# Altium PCB ProbeHead.PcbDoc (part 1 of 2)
Units mm, origin at the board's own origin, x right, y up, seen from the top; angles counter-clockwise.
Board outline 70 x 35 mm, 4 copper layers (L1, L2, L3, L4), stack 1.883 mm thick; 107 components, 62 nets, 327 pads, 211 vias.
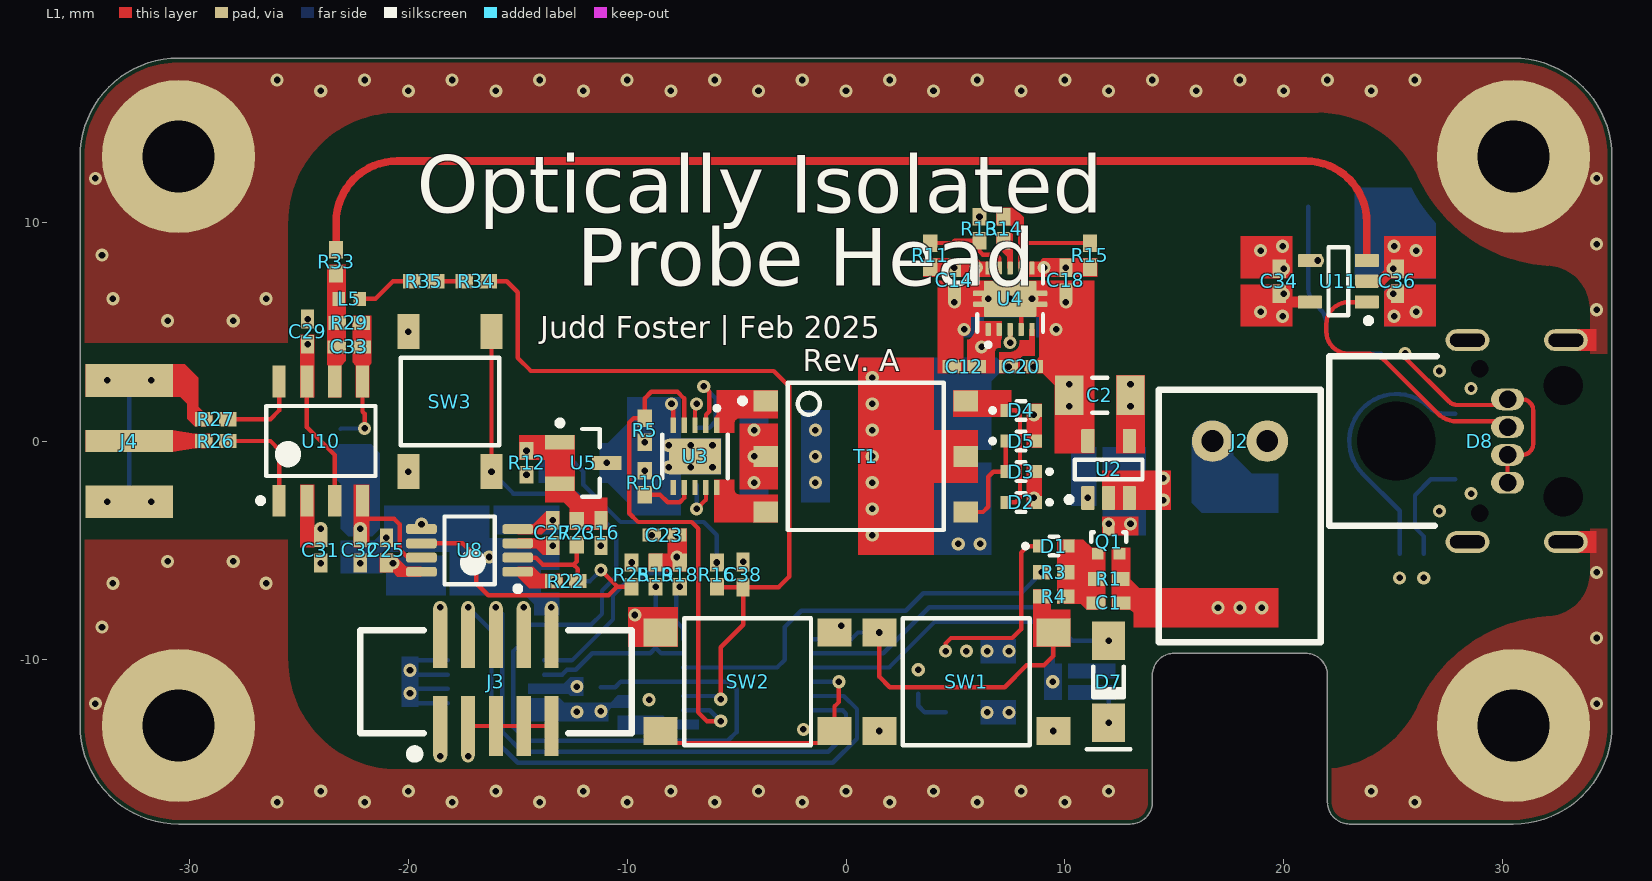
[diagram p0: L1 view]
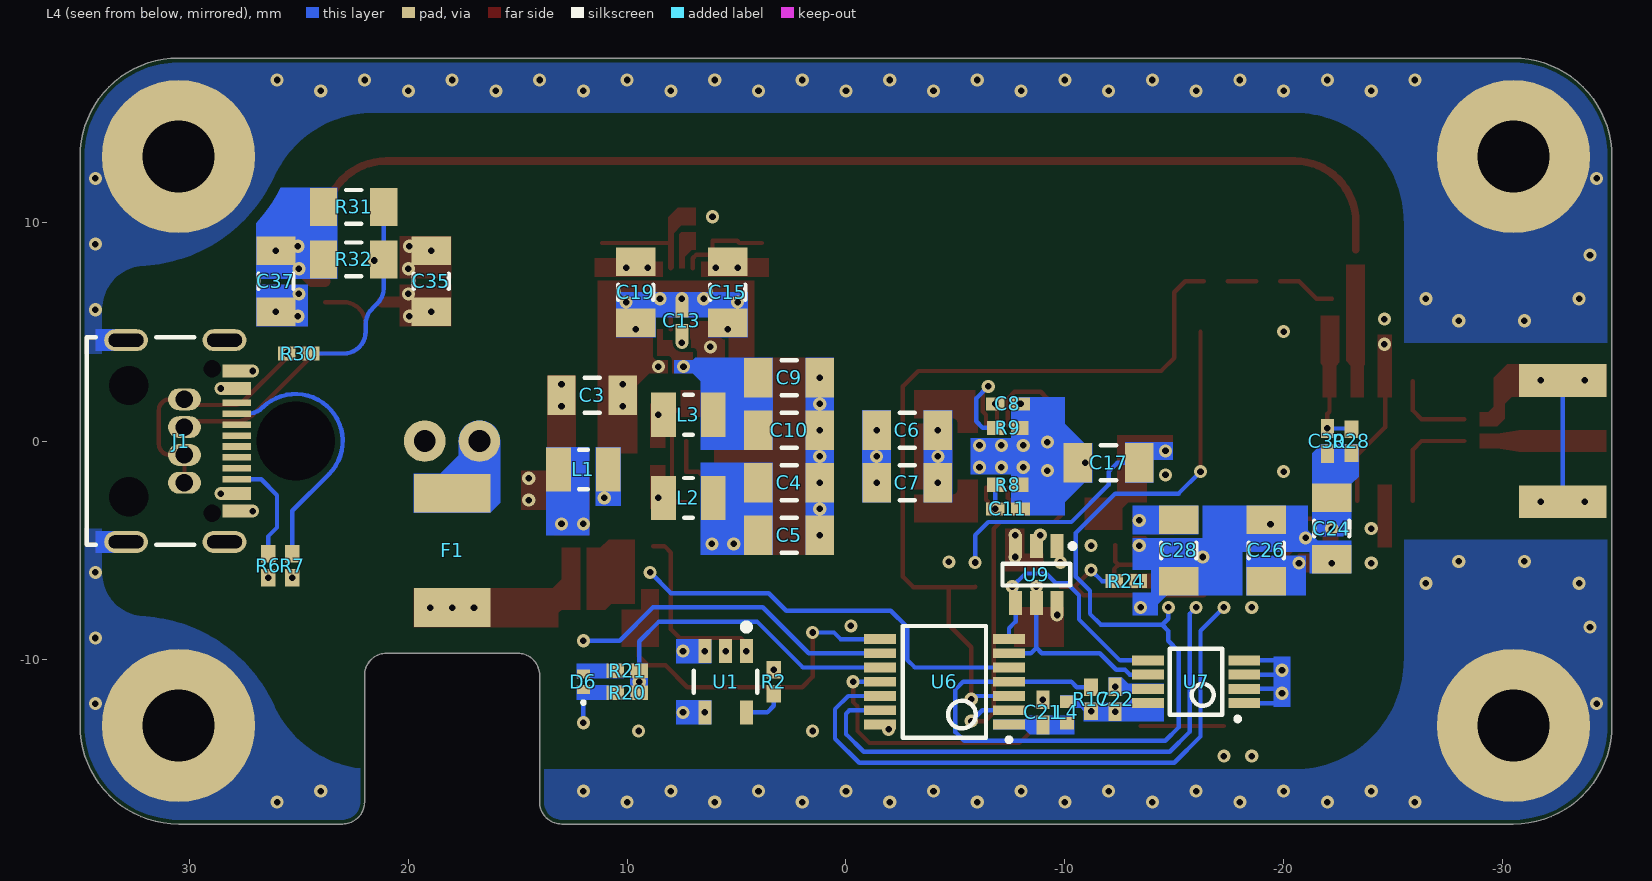
[diagram p1: L4 view, seen from below]
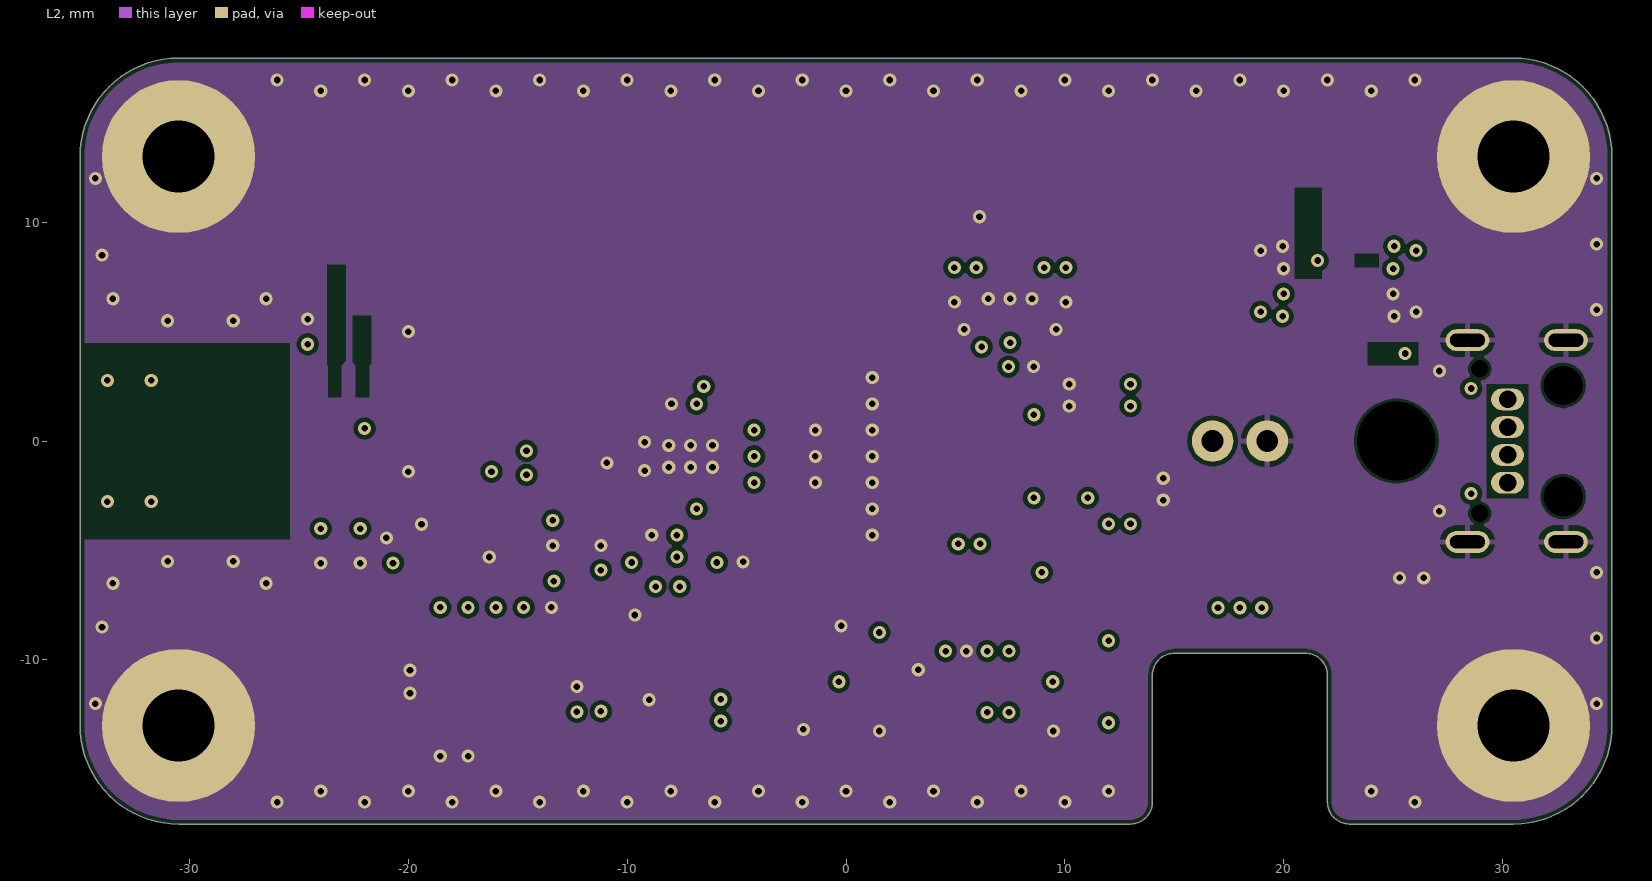
[diagram p2: L2]
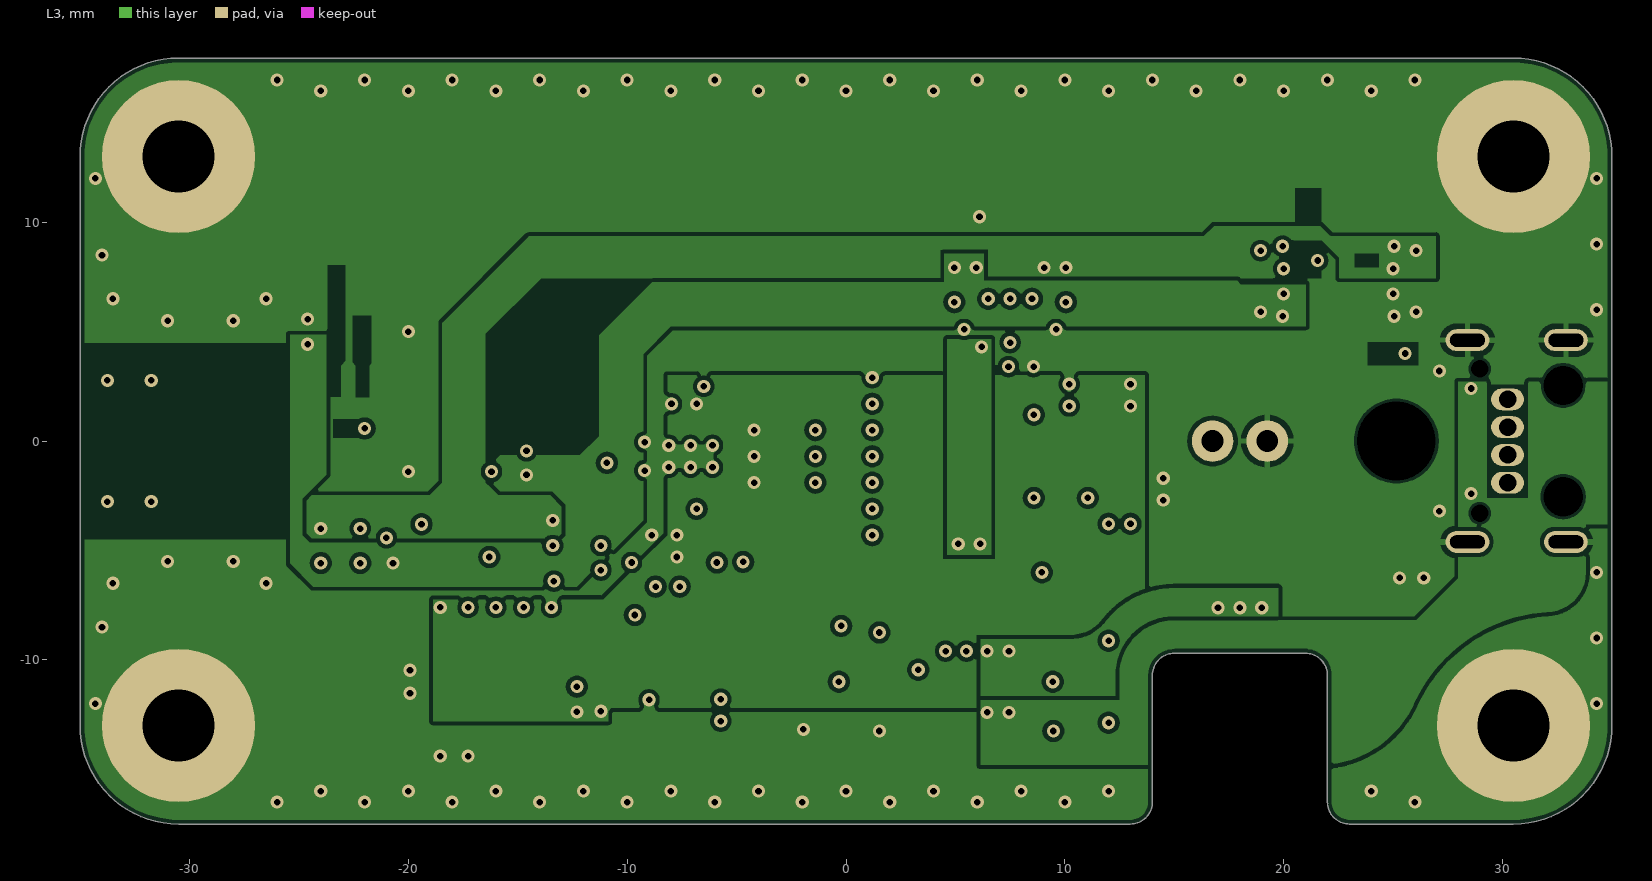
[diagram p3: L3]

## Layer stack, top to bottom
Top Solder: solder mask 0.0102, Solder Resist, Dk 3.5
L1: signal copper 0.0356
Dielectric 2: prepreg 0.0711, PP-006, Dk 4.1
L2: signal copper 0.035
Dielectric 1: dielectric 1.6, FR-4, Dk 4.8
L3: signal copper 0.035
Dielectric 3: prepreg 0.0711, PP-006, Dk 4.1
L4: signal copper 0.0356
Bottom Solder: solder mask 0.0102, Solder Resist, Dk 3.5

## Board outline
-30.5,-17.5 13,-17.5 ccw(c13,-16.5) 14,-16.5 14,-10.7 cw(c15,-10.7) 15,-9.7 21,-9.7 cw(c21,-10.7) 22,-10.7 22,-16.5 ccw(c23,-16.5) 23,-17.5 30.5,-17.5 ccw(c30.5,-13) 35,-13 35,13 ccw(c30.5,13) 30.5,17.5 -30.5,17.5 ccw(c-30.5,13) -35,13 -35,-13 ccw(c-30.5,-13)

## Design rules (kind name [scope] priority, off if disabled: settings)
BoardOutlineClearance BoardOutlineClearance_Exceptions [HasFootprint('GCT_USB4110-GF-A') Or HasFootprint('INDUSTRIALFIBEROPTICS_IF-E99B')] p1: gap=0 ignorepadtopadclearanceinfootprint=FALSE
BoardOutlineClearance [All] p2: gap=0.2 ignorepadtopadclearanceinfootprint=FALSE
Clearance Clearance_MOLEX_2171800001 [HasFootprint('MOLEX_2171800001') vs HasFootprint('MOLEX_2171800001')] p1: gap=0.13 ignorepadtopadclearanceinfootprint=FALSE except(0.07: Arc-Hole Track-Hole SMDPad-Hole THPad-Hole Via-Hole Fill-Hole Poly-Hole Region-Hole Text-Hole; 0.2: Arc-Fill Arc-Poly Track-Fill Track-Poly SMDPad-Fill SMDPad-Poly THPad-Fill THPad-Poly Via-Fill Via-Poly Fill-Fill Fill-Poly Poly-Poly)
Clearance [All] p2: gap=0.13 ignorepadtopadclearanceinfootprint=FALSE except(0.2: Arc-Fill Arc-Poly Track-Fill Track-Poly SMDPad-Fill SMDPad-Poly THPad-Fill THPad-Poly Via-Fill Via-Poly Fill-Fill Fill-Poly Poly-Poly)
HoleSize [All] p1: absolutevalues=TRUE maxlimit=6 minlimit=0.3 maxpercent=80.000 minpercent=20.000
MinimumSolderMaskSliver [All] p1: minsoldermaskwidth=0.1
PolygonConnect [All] p1: thpad.connectstyle=Relief thpad.reliefconductorwidth=0.254 thpad.reliefentries=4 thpad.polygonreliefangle="90 Angle" thpad.airgapwidth=0.254 smdpad.connectstyle=Relief smdpad.reliefconductorwidth=0.254 smdpad.reliefentries=4 smdpad.polygonreliefangle="90 Angle" smdpad.airgapwidth=0.254 via.connectstyle=Direct via.reliefconductorwidth=0.254 via.reliefentries=4 via.polygonreliefangle="90 Angle" via.airgapwidth=0.254
RoutingVias [All] p1: holewidth=0.3 width=0.6 viastyle="Through Hole" minholewidth=0.3 minwidth=0.6 maxholewidth=0.5 maxwidth=1
SilkToSolderMaskClearance [IsPad] p1: minsilkscreentomaskgap=0.15 clearancetoexposedcopper=TRUE
SolderMaskExpansion SolderMaskExpansion_Via [IsVia] p1: expansion=0.102 istentingtop=TRUE
SolderMaskExpansion [All] p2: expansion=0.05 istentingtop=FALSE
Width [All] p1: maxlimit=2 minlimit=0.2 preferedwidth=0.4
27 further rules are at their usual default settings.

## Classes and differential pairs
net class S50: AMP.OUT
component class PWR: C1 C2 C3 C4 C5 C6 C7 C8 C9 C10 C11 C12 C13 C14 C15 C16 C17 C18 C19 C20 D1 D2 D3 D4 D5 F1 J1 J2 L1 L2 L3 Q1 R1 R2 R3 R4 R5 R6 R7 R8 R9 R10 R11 R12 R13 R14 R15 SW1 T1 U1 U2 U3 U4 U5
component class FE: C29 C30 C31 C32 C33 C38 J4 L5 R16 R26 R27 R28 R29 R33 R34 R35 U10
component class EO: C34 C35 C36 C37 D8 R30 R31 R32 U11
component class CTRL: C21 C22 D6 D7 J3 L4 R17 R18 R19 R20 R21 SW2 SW3 U6 U7
component class BIAS: C23 C24 C25 C26 C27 C28 R22 R23 R24 R25 U8 U9

## Components (designator, comment, footprint, x,y, rotation, side; value= is the part's Value field where it differs from the comment)
C1 "100n,10%,25V,X7R,0402" CAPC1005X06N 12,-7.4 r0 top value=100nF
C2 "10u,20%,50V,X5R,1206" CAPC3216X16N 11.6,2.1 r0 top value=10u
C3 "10u,20%,50V,X5R,1206" CAPC3216X16N 11.6,2.1 r0 bottom value=10u
C4 "10u,20%,50V,X5R,1206" CAPC3216X16N 2.6,-1.9 r0 bottom value=10u
C5 "10u,20%,50V,X5R,1206" CAPC3216X16N 2.6,-4.3 r0 bottom value=10u
C6 "10u,20%,50V,X5R,1206" CAPC3216X16N -2.8,0.5 r180 bottom value=10u
C7 "10u,20%,50V,X5R,1206" CAPC3216X16N -2.8,-1.9 r180 bottom value=10u
C8 "100n,10%,25V,X7R,0402" CAPC1005X06N -7.4,1.7 r0 bottom value=100nF
C9 "10u,20%,50V,X5R,1206" CAPC3216X16N 2.6,2.9 r180 bottom value=10u
C10 "10u,20%,50V,X5R,1206" CAPC3216X16N 2.6,0.5 r180 bottom value=10u
C11 "100n,10%,25V,X7R,0402" CAPC1005X06N -7.4,-3.1 r0 bottom value=100nF
C12 "100n,10%,25V,X7R,0402" CAPC1005X06N 5.4,3.4 r0 top value=100nF
C13 "10n,10%,25VDC,X7R,0402" CAPC1005X06N 7.5,5.5 r90 bottom
C14 "100n,10%,25V,X7R,0402" CAPC1005X06N 4.95,7.35 r90 top value=100nF
C15 "10u,20%,50V,X5R,1206" CAPC3216X16N 5.4,6.8 r90 bottom value=10u
C16 "100n,10%,25V,X7R,0402" CAPC1005X06N -11.2,-4.2 r90 top value=100nF
C17 "10u,20%,50V,X5R,1206" CAPC3216X16N -12,-1 r180 bottom value=10u
C18 "100n,10%,25V,X7R,0402" CAPC1005X06N 10.05,7.35 r270 top value=100nF
C19 "10u,20%,50V,X5R,1206" CAPC3216X16N 9.6,6.8 r270 bottom value=10u
C20 "100n,10%,25V,X7R,0402" CAPC1005X06N 8,3.4 r0 top value=100nF
C21 "100n,10%,25V,X7R,0402" CAPC1005X06N -9,-12.4 r270 bottom value=100nF
C22 "100n,10%,25V,X7R,0402" CAPC1005X06N -12.3,-11.8 r270 bottom value=100nF
C23 "100n,10%,25V,X7R,0402" CAPC1005X06N -8.3,-4.3 r0 top value=100nF
C24 "10u,20%,50V,X5R,1206" CAPC3216X16N -22.2,-4 r90 bottom value=10u
C25 "100n,10%,25V,X7R,0402" CAPC1005X06N -21,-5 r270 top value=100nF
C26 "10u,20%,50V,X5R,1206" CAPC3216X16N -19.2,-5 r270 bottom value=10u
C27 "100n,10%,25V,X7R,0402" CAPC1005X06N -13.4,-4.2 r270 top value=100nF
C28 "10u,20%,50V,X5R,1206" CAPC3216X16N -15.2,-5 r270 bottom value=10u
C29 "100n,10%,25V,X7R,0402" CAPC1005X06N -24.6,5 r270 top value=100nF
C30 "Omit,0402" CAPC1005X06N -22,0 r90 bottom value=Omit
C31 "100n,10%,25V,X7R,0402" CAPC1005X06N -24,-5 r270 top value=100nF
C32 "100n,10%,25V,X7R,0402" CAPC1005X06N -22.2,-5 r90 top value=100nF
C33 "Omit,0402" CAPC1005X06N -22.7,4.3 r180 top value=Omit
C34 "100n,10%,25V,X7R,0402" CAPC1005X06N 19.8,7.3 r270 top value=100nF
C35 "10u,20%,50V,X5R,1206" CAPC3216X16N 18.95,7.3 r270 bottom value=10u
C36 "100n,10%,25V,X7R,0402" CAPC1005X06N 25.2,7.3 r270 top value=100nF
C37 "10u,20%,50V,X5R,1206" CAPC3216X16N 26.05,7.3 r270 bottom value=10u
C38 "100n,10%,25V,X7R,0402" CAPC1005X06N -4.7,-6.1 r270 top value=100nF
D1 "PMEG2010AEBF" NEXPERIA_PKG_SOD523 9.5,-4.8 r0 top
D2 "PMEG2010AEBF" NEXPERIA_PKG_SOD523 8,-2.8 r180 top
D3 "PMEG2010AEBF" NEXPERIA_PKG_SOD523 8,-1.4 r180 top
D4 "PMEG2010AEBF" NEXPERIA_PKG_SOD523 8,1.4 r0 top
D5 "PMEG2010AEBF" NEXPERIA_PKG_SOD523 8,0 r0 top
D6 "CDBQR0130R" DFN65P100X50-2N 12,-11 r90 bottom
D7 "Red/Green" LED_XZMDKVG55W-4 12,-11 r90 top
D8 "IF-E99B" INDUSTRIALFIBEROPTICS_IF-E99B 30.23,0 r270 top
F1 "500mA" BELFUSE_CHIP1812 18,-5 r270 bottom
J1 "USB-C" MOLEX_2171800001 32.9,0 r270 bottom
J2 "S2B-XH-A" JST_S2B-XH-A 18,0 r0 top
J3 "3221-10-0300-00" "CNC Tech_3221-10-0300-00" -16,-11 r90 top
J4 "CON-SMA-EDGE-S" RFSOLUTIONS_CON-SMA-EDGE-S -33.25,0 r90 top
L1 "10uH,20%,680mA,1007" TAIYO-YUDEN_LSQPA251818T100M 12,-1.3 r180 bottom value=10uH
L2 "10uH,20%,680mA,1007" TAIYO-YUDEN_LSQPA251818T100M 7.2,-2.6 r180 bottom value=10uH
L3 "10uH,20%,680mA,1007" TAIYO-YUDEN_LSQPA251818T100M 7.2,1.2 r180 bottom value=10uH
L4 "470R" INDC1005X05N -10.1,-12.4 r270 bottom
L5 "470R" INDC1005X05N -22.7,6.5 r180 top
Q1 "FDY102PZ" ONSEMI_SC-89 12,-4.6 r90 top
R1 "5k11,1%,0.063W,0402" RESC1005X04N 12,-6.3 r0 top value=5k11
R2 "5k11,1%,0.063W,0402" RESC1005X04N 3.3,-11 r270 bottom value=5k11
R3 "1k,0.1%,0.063W,0402" RESC1005X04N 9.5,-6 r0 top value=1k
R4 "10R,1%,0.063W,0402" RESC1005X04N 9.5,-7.1 r180 top value=10R
R5 "10k,0.1%,0.063W,0402" RESC1005X04N -9.2,0.5 r90 top value=10k
R6 "5k11,1%,0.063W,0402" RESC1005X04N 26.4,-5.7 r90 bottom value=5k11
R7 "5k11,1%,0.063W,0402" RESC1005X04N 25.3,-5.7 r90 bottom value=5k11
R8 "Omit" RESC1005X04N -7.4,-2 r0 bottom
R9 "Omit" RESC1005X04N -7.4,0.6 r0 bottom
R10 "Omit" RESC1005X04N -9.2,-1.9 r270 top
R11 "10k,0.1%,0.063W,0402" RESC1005X04N 3.85,8.5 r270 top value=10k
R12 "1k,0.1%,0.063W,0402" RESC1005X04N -14.6,-1 r270 top value=1k
R13 "10k,0.1%,0.063W,0402" RESC1005X04N 6.1,9.7 r270 top value=10k
R14 "10k,0.1%,0.063W,0402" RESC1005X04N 7.2,9.7 r270 top value=10k
R15 "10k,0.1%,0.063W,0402" RESC1005X04N 11.15,8.5 r90 top value=10k
R16 "1k,0.1%,0.063W,0402" RESC1005X04N -5.9,-6.1 r90 top value=1k
R17 "10k,0.1%,0.063W,0402" RESC1005X04N -11.2,-11.8 r270 bottom value=10k
R18 "5k11,1%,0.063W,0402" RESC1005X04N -7.6,-6.1 r90 top value=5k11
R19 "5k11,1%,0.063W,0402" RESC1005X04N -8.7,-6.1 r90 top value=5k11
R20 "330R,1%,0.063W,0402" RESC1005X04N 10,-11.5 r180 bottom value=330R
R21 "1k,0.1%,0.063W,0402" RESC1005X04N 10,-10.5 r180 bottom value=1k
R22 "1k,0.1%,0.063W,0402" RESC1005X04N -12.8,-6.4 r180 top value=1k
R23 "1k,0.1%,0.063W,0402" RESC1005X04N -12.3,-4.2 r270 top value=1k
R24 "1k,0.1%,0.063W,0402" RESC1005X04N -12.8,-6.4 r0 bottom value=1k
R25 "1k,0.1%,0.063W,0402" RESC1005X04N -9.8,-6.1 r270 top value=1k
R26 "10R,1%,0.063W,0402" RESC1005X04N -28.8,0 r0 top value=10R
R27 "10R,1%,0.063W,0402" RESC1005X04N -28.8,1 r0 top value=10R
R28 "Omit" RESC1005X04N -23.1,0 r90 bottom
R29 "0R0,0.1W,0402" RESC1005X04N -22.7,5.4 r180 top value=0R
R30 "0R0,0.1W,0402" RESC1005X04N 25,4 r0 bottom value=0R
R31 "499R,0.1%,0.52W,1206" VISHAY_PKG_TNPW1206 22.5,10.7 r180 bottom value=499R
R32 "499R,0.1%,0.52W,1206" VISHAY_PKG_TNPW1206 22.5,8.3 r180 bottom value=499R
R33 "49R9,1%,0.063W,0402" RESC1005X04N -23.3,8.2 r90 top value=49R9
R34 "1k,0.1%,0.063W,0402" RESC1005X04N -16.9,7.3 r180 top value=1k
R35 "1k,0.1%,0.063W,0402" RESC1005X04N -19.3,7.3 r180 top value=1k
SW1 "PTS645SK43SMTR92 LFS" "C&K_PTS645SK43SMTR92 LFS" 5.5,-11 r0 top
SW2 "PTS645SK43SMTR92 LFS" "C&K_PTS645SK43SMTR92 LFS" -4.5,-11 r0 top
SW3 "PTS525SM15SMTR2 LFS" "C&K_PTS525SM15SMTR2 LFS" -18.1,1.8 r90 top
T1 "760390013" WURTH_760390013 0.9,-0.7 r0 top
U1 "MCP73831T-2ACI/OT" MICROCHIP_PKG_SOT23(C04-2091-OT) 5.5,-11 r0 bottom
U2 "TPS613222ADBVR" TEXASINSTRUMENTS_PKG_DBV0005A 12,-1.3 r90 top
U3 "LT3999EDD#PBF" ANALOGDEVICES_PKG_DD -6.9,-0.7 r270 top
U4 "TPS7A3901DSCR" TEXASINSTRUMENTS_PKG_DSC0010J 7.5,6.5 r90 top
U5 "TL431BIDBZR" SOT95P240X120-3N -12,-1 r0 top
U6 "PIC16F15323T-I/ST" MICROCHIP_PKG_TSSOP-14(C04-2087A) -4.5,-11 r0 bottom
U7 "24LC256T-I/MS" MICROCHIP_PKG_MSOP8(C04-111-MS) -16,-11 r0 bottom
U8 "LM7332MMX/NOPB" TEXASINSTRUMENTS_PKG_DGK0008A -17.2,-5 r180 top
U9 "MCP4725A0T-E/CH" SOTFL95P260X145-6 -8.7,-6.1 r270 bottom
U10 "AD8130ARZ" ANALOGDEVICES_PKG_R-8 -24,0 r90 top
U11 "LMH6609MF/NOPB" TEXASINSTRUMENTS_PKG_DBV0005A 22.5,7.3 r180 top

## Footprints (in the part's own frame and the unit in brackets; to place one, negate y for a bottom-side part, rotate by r counter-clockwise, add the part's x,y. Pads: shape width x height; smd on the part's side, far side on the other; paste and mask are expansions set on the pad)
ANALOGDEVICES_PKG_DD [mm]
  rect 0.7x0.25 smd: 1(-1.425,1) 2(-1.425,0.5) 3(-1.425,0) 4(-1.425,-0.5) 5(-1.425,-1) 6(1.425,-1) 7(1.425,-0.5) 8(1.425,0) 9(1.425,0.5) 10(1.425,1)
  rect 1.65x2.38 smd: 11(0,0)
  silkscreen extent -2.3,-1.5 1,1.5, body extent -1.5,-1.5 1.5,1.5, height 0.8
ANALOGDEVICES_PKG_R-8 [mm]
  rect 1.45x0.6 smd: 1(-2.725,1.905) 2(-2.725,0.635) 3(-2.725,-0.635) 4(-2.725,-1.905) 5(2.725,-1.905) 6(2.725,-0.635) 7(2.725,0.635) 8(2.725,1.905)
  silkscreen extent -2.85,-2.5 1.6,2.88, body extent -2,-2.5 2,2.5, height 1.75
BELFUSE_CHIP1812 [mm] "BELFUSE_CHIP1812"
  rect 1.78x3.5 smd: 1(-2.615,0) 2(2.615,0)
  body extent -2.27,-1.62 2.27,1.62, height 0.7
"C&K_PTS525SM15SMTR2 LFS" [mm] "C&K_PTS525SM15SMTR2 LFS"
  rect 1.6x1 smd mask+0.05: 1(-3.2,1.9) 2(3.2,1.9) 3(-3.2,-1.9) 4(3.2,-1.9)
  silkscreen extent -2,-2.25 2,2.25, body extent -3.2,-2.55 3.2,2.55, height 1.6
"C&K_PTS645SK43SMTR92 LFS" [mm] "C&K_PTS645SK43SMTR92 LFS"
  rect 1.55x1.3 smd mask+0.05: 1(-3.975,2.25) 2(3.975,2.25) 3(-3.975,-2.25) 4(3.975,-2.25)
  silkscreen extent -2.9,-2.9 2.9,2.9, body extent -3,-3 3,3, height 4.3
CAPC1005X06N [mm]
  rect 0.85x0.6 smd: 1(-0.575,0) 2(0.575,0)
  body extent -0.53,-0.28 0.53,0.27, height 0.55
CAPC3216X16N [mm] "Chip Capacitor, 2-Leads, Body 3.20x1.60mm, IPC Medium Density"
  rect 1.3x1.8 smd: 1(-1.4,0) 2(1.4,0)
  silkscreen extent -0.35,-0.8 0.35,0.8, body extent -1.75,-0.95 1.75,0.95, height 1.6
"CNC Tech_3221-10-0300-00" [mm] "CNC Tech_3221-10-0300-00"
  rect 2.76x0.65 smd mask+0.05: 1(-2.02,2.54) 2(2.02,2.54) 3(-2.02,1.27) 4(2.02,1.27) 5(-2.02,0) 6(2.02,0) 7(-2.02,-1.27) 8(2.02,-1.27) 9(-2.02,-2.54) 10(2.02,-2.54)
  silkscreen extent -3.5,-6.2 2.35,6.2, body extent -2.5,-6.35 2.5,6.35, height 5.55
DFN65P100X50-2N [mm] "DFN, 2-Leads, Body 0.60x1.00mm, Pitch 0.65mm, IPC Medium Density"
  rect 0.4x0.6 smd: 1(-0.35,0) 2(0.35,0)
  silkscreen extent -1,-0.05 -0.9,0.05, body extent -0.5,-0.3 0.5,0.3, height 0.5
INDC1005X05N [mm] "Chip Inductor, 2-Leads, Body 1.00x0.50mm, IPC Medium Density"
  rect 0.57x0.64 smd: 1(-0.49,0) 2(0.49,0)
  body extent -0.5,-0.25 0.5,0.25, height 0.5
INDUSTRIALFIBEROPTICS_IF-E99B [mm]
  oval 1x1.5 hole 0.8 mask+0: 1(1.905,0) 2(0.635,0) 3(-0.635,0) 4(-1.905,0)
  round 0 hole 1.8 unplated mask+0: ""(-2.54,2.54) ""(2.54,2.54)
  round 0 hole 3.6 unplated mask+0: ""(0,-5.08)
  silkscreen extent -3.87,-8.14 3.87,-3.23, body extent -4.32,-8.31 4.32,19.44, height 11.3
JST_S2B-XH-A [mm]
  round 1.9 hole 1 mask+0.05: 1(-1.25,0) 2(1.25,0)
  silkscreen extent -3.7,-9.2 3.7,2.35, body extent -3.7,-9.2 3.7,2.3, height 6.1
LED_XZMDKVG55W-4 [mm] "SunLED XZMDKVG55W-4"
  rect 1.75x1.5 smd: 1(-1.875,0) 2(1.875,0)
  silkscreen extent -3.09,-1 0.7,1, body extent -1.6,-0.8 1.6,0.8, height 1.1
MICROCHIP_PKG_MSOP8(C04-111-MS) [mm]
  rect 1.45x0.45 smd: 1(-2.2,0.975) 2(-2.2,0.325) 3(-2.2,-0.325) 4(-2.2,-0.975) 5(2.2,-0.975) 6(2.2,-0.325) 7(2.2,0.325) 8(2.2,0.975)
  silkscreen extent -2,-1.5 1.2,1.8, body extent -1.5,-1.5 1.5,1.5, height 1.1
MICROCHIP_PKG_SOT23(C04-2091-OT) [mm]
  rect 0.6x1.1 smd: 1(-0.95,-1.4) 2(0,-1.4) 3(0.95,-1.4) 4(0.95,1.4) 5(-0.95,1.4)
  silkscreen extent -1.45,-2.65 1.45,0.5, body extent -1.45,-0.8 1.45,0.8, height 1.45
MICROCHIP_PKG_TSSOP-14(C04-2087A) [mm]
  rect 1.45x0.45 smd: 1(-2.95,1.95) 2(-2.95,1.3) 3(-2.95,0.65) 4(-2.95,0) 5(-2.95,-0.65) 6(-2.95,-1.3) 7(-2.95,-1.95) 8(2.95,-1.95) 9(2.95,-1.3) 10(2.95,-0.65) 11(2.95,0) 12(2.95,0.65) 13(2.95,1.3) 14(2.95,1.95)
  silkscreen extent -3.05,-2.55 1.9,2.75, body extent -2.25,-2.55 2.25,2.55, height 1.2
MOLEX_2171800001 [mm]
  rrect100% 1x2 hole 0.6 slot 1.6 at 90 deg: 0(-4.61,0) 0(-4.61,4.5) 0(4.61,0) 0(4.61,4.5)
  rect 0.6x1.3 smd: A1/B12(-3.2,5.06) A4/B9(-2.4,5.06) A9/B4(2.4,5.06) A12/B1(3.2,5.06)
  rect 0.3x1.3 smd: A5(-1.25,5.06) A6(-0.25,5.06) A7(0.25,5.06) A8(1.25,5.06) B5(1.75,5.06) B6(0.75,5.06) B7(-0.75,5.06) B8(-1.75,5.06)
  round 0.65 hole 0.8 unplated mask+0.102: ""(-3.3,3.94) ""(3.3,3.94)
  silkscreen extent -4.73,-1.8 4.73,3.12, body extent -4.73,-2.9 4.74,5.5, height 7.79
NEXPERIA_PKG_SOD523 [mm]
  rect 0.5x0.6 smd: 1(-0.7,0) 2(0.7,0)
  silkscreen extent -1.4,-0.43 0.2,0.43, body extent -0.63,-0.43 0.63,0.43, height 0.65
ONSEMI_SC-89 [mm] "ONSEMI_SC-89"
  rect 0.53x0.53 smd: 1(-0.55,0.5) 2(-0.55,-0.5) 3(0.55,0)
  silkscreen extent 0,-0.8 0.43,0.8, body extent -0.42,-0.8 0.43,0.8, height 0.7
RESC1005X04N [mm] "Chip Resistor, 2-Leads, Body 1.0x0.5mm, IPC Medium Density"
  rect 0.8x0.65 smd: 1(-0.55,0) 2(0.55,0)
  body extent -0.52,-0.27 0.53,0.28, height 0.4
RFSOLUTIONS_CON-SMA-EDGE-S [mm]
  rect 1x4 smd: 1(0,-0.5)
  rect 1.5x4 smd: 2(-2.77,-0.5) 2(2.77,-0.5)
  rect 1.5x4 smd far side: 2(-2.77,-0.5) 2(2.77,-0.5)
  body extent -3.18,-2.06 3.17,11.27, height 3.55
SOT95P240X120-3N [mm] "SOT23, 3-Leads, Body 3.1x2.7mm (max), Pitch 0.95mm, IPC Medium Density"
  rect 1.35x0.65 smd: 1(-1.075,0.95) 2(-1.075,-0.95) 3(1.075,0)
  silkscreen extent -1.2,-1.55 0.75,1.95, body extent -0.75,-1.56 0.75,1.56, height 1.2
SOTFL95P260X145-6 [mm] "SOT23, 6-Leads, Body 2.90x2.80mm, Pitch 0.95mm"
  rect 1.1x0.6 smd: 1(-1.3,0.95) 2(-1.3,0) 3(-1.3,-0.95) 4(1.3,-0.95) 5(1.3,0) 6(1.3,0.95)
  silkscreen extent -1.4,-1.55 0.5,1.75, body extent -1.5,-1.53 1.5,1.53, height 1.1
TAIYO-YUDEN_LSQPA251818T100M [mm]
  rect 1.13x2.02 smd: 1(-1.135,0) 2(1.135,0)
  silkscreen extent -0.2,-0.91 0.2,0.91, body extent -1.35,-1 1.35,1, height 2
TEXASINSTRUMENTS_PKG_DBV0005A [mm] "SOT23, 5-Leads, Body 2.90x2.80mm, Pitch 0.95mm"
  rrect17% 1.1x0.6 smd mask+0.07: 1(-1.3,0.95) 2(-1.3,0) 3(-1.3,-0.95) 4(1.3,-0.95) 5(1.3,0.95)
  silkscreen extent -1.5,-1.55 0.45,1.92, body extent -1.4,-1.45 1.4,1.45, height 1.2
TEXASINSTRUMENTS_PKG_DGK0008A [mm]
  rrect50% 1.4x0.45 smd: 1(-2.2,0.975) 2(-2.2,0.325) 3(-2.2,-0.325) 4(-2.2,-0.975) 5(2.2,-0.975) 6(2.2,-0.325) 7(2.2,0.325) 8(2.2,0.975)
  silkscreen extent -2.33,-1.55 1.15,1.87, body extent -2.45,-1.55 2.45,1.55, height 1.1
TEXASINSTRUMENTS_PKG_DSC0010J [mm]
  rrect40% 0.6x0.25 smd: 1(-1.4,1) 2(-1.4,0.5) 3(-1.4,0) 4(-1.4,-0.5) 5(-1.4,-1) 6(1.4,-1) 7(1.4,-0.5) 8(1.4,0) 9(1.4,0.5) 10(1.4,1)
  rrect40% 0.25x0.6 smd: 11(-0.25,1.4) 11(-0.25,-1.4) 11(0.25,1.4) 11(0.25,-1.4)
  rrect6% 1.65x2.4 smd: 11(0,0)
  silkscreen extent -2.2,-1.5 1.5,1.5, body extent -1.5,-1.5 1.5,1.5, height 0.8
VISHAY_PKG_TNPW1206 [mm]
  rect 1.25x1.75 smd: 1(-1.375,0) 2(1.375,0)
  silkscreen extent -0.35,-0.77 0.35,0.77, body extent -1.65,-0.87 1.65,0.87, height 0.65
WURTH_760390013 [mm]
  rect 1.12x0.96 smd: 1(-4.57,2.54) 2(-4.57,0) 3(-4.57,-2.54) 4(4.57,-2.54) 5(4.57,0) 6(4.57,2.54)
  silkscreen extent -5.73,-3.36 3.57,3.36, body extent -5,-3.24 4.95,3.24, height 4.06

## Part data
C1 C8 C11 C12 C14 C16 C18 C20 C21 C22 C23 C25 C27 C29 C31 C32 C34 C36 C38: library part CAP,Cer,100nF,10%,25V,X7R,0402, "0.1ï¿½F ï¿½10% 25V Ceramic Capacitor X7R 0402 (1005 Metric)", Manufacturer 1="Murata Electronics", Manufacturer 1 Part Number=GRM155R71E104KE14J, Vendor 1 Part Number=490-14603-1-ND, CreatedBy="Judd Foster", HelpURL=https://search.murata.co.jp/Ceramy/image/img/A01X/G101/ENG/GRM155R71E104KE14-01.pdf, Part Name=CAP,Cer,100nF,10%,25V,X7R,0402, Vendor 1=DigiKey
C2 C3 C4 C5 C6 C7 C9 C10 C15 C17 C19 C24 C26 C28 C35 C37: library part CAP,Cer,10uF,50VDC,X5R,1206, "10ï¿½F ï¿½20% 50V Ceramic Capacitor X5R 1206 (3216 Metric)", Manufacturer 1="Samsung Electro-Mechanics", Manufacturer 1 Part Number=CL31A106MBHNNNE, Vendor 1 Part Number=1276-6736-1-ND, CreatedBy="Judd Foster", HelpURL=https://www.samsungsem.com/resources/file/global/support/product_catalog/MLCC.pdf, Part Name=CAP,Cer,10uF,50VDC,X5R,1206, Vendor 1=Digikey
C13: library part CAP,Cer,10nF,10%,25VDC,X7R,0402, "10000pF ï¿½10% 25V Ceramic Capacitor X7R 0402 (1005 Metric)", Manufacturer 1="Murata Electronics", Manufacturer 1 Part Number=GCM155R71E103KA37D, Vendor 1 Part Number=490-6043-1-ND, CreatedBy="Judd Foster", HelpURL=https://psearch.en.murata.com/capacitor/product/GCM155R71E103KA37%23.pdf, Part Name=CAP,Cer,10nF,10%,25VDC,X7R,0402, Vendor 1=Digikey
C30 C33: library part CAP,Omit,0402, "Omit", Manufacturer 1=N/A, CreatedBy="Judd Foster", HelpURL=N/A, Manufacturer 1 Part Number=N/A, Part Name=CAP,Omit,0402, Vendor 1=N/A, Vendor 1 Part Number=N/A
D1 D2 D3 D4 D5: library part DIODE,Schottky,20V,1A,SOD523, "Diode 20 V 1A Surface Mount SOD-523", Manufacturer 1="Nexperia USA Inc.", Vendor 1 Part Number=1727-8539-1-ND, CreatedBy="Judd Foster", HelpURL=https://assets.nexperia.com/documents/data-sheet/PMEG2010AEB.pdf, Manufacturer 1 Part Number=PMEG2010AEBF, Part Name=DIODE,Schottky,20V,1A,SOD523, Vendor 1=DigiKey
D6: library part DIODE,Schottky,30V,100mA,SMD, "Diode 30 V 100mA Surface Mount 0402C/SOD-923F", Manufacturer 1="Comchip Technology", Vendor 1 Part Number=641-1272-1-ND, CreatedBy="Judd Foster", HelpURL=https://mm.digikey.com/Volume0/opasdata/d220001/medias/docus/3209/CDBQR0130R.pdf, Manufacturer 1 Part Number=CDBQR0130R, Part Name=DIODE,Schottky,30V,100mA,SMD, Vendor 1=Digikey
D7: library part LED,Bi-Color,Red/Grn,SMD,1206, "Green, Red 570nm Green, 630nm Red LED Indication - Discrete 2.1V Green, 1.95V Red 1206 (3216 Metric)", Manufacturer 1=SunLED, Manufacturer 1 Part Number=XZMDKVG55W-4, Vendor 1 Part Number=1497-1314-1-ND, CreatedBy="Judd Foster", HelpURL=https://www.sunledusa.com/products/spec/XZMDKVG55W-4.pdf, Part Name=LED,Bi-Color,Red/Grn,SMD,1206, Vendor 1=Digikey
D8: library part "XMITTER,FIBER OPTIC,650NM,1.9V,IF-E99B", "Fiber Optic Transmitter 650nm 1.9V 50 mA Connector-less", Manufacturer 1="Industrial Fiber Optics", Vendor 1 Part Number=FB161-ND, CreatedBy="Judd Foster", HelpURL=https://i-fiberoptics.com/pdf/if-e99bdatasheet.pdf, Manufacturer 1 Part Number=IF-E99B, Part Name="XMITTER,FIBER OPTIC,650NM,1.9V,IF-E99B", Vendor 1=DigiKey
F1: library part PTC,30V,500mA,1812, "Polymeric PTC Resettable Fuse 30V 500 mA Ih Surface Mount 1812 (4532 Metric), Concave", Manufacturer 1="Bel Fuse Inc.", Manufacturer 1 Part Number=0ZCG0050AF2C, Vendor 1 Part Number=507-1762-1-ND, CreatedBy="Judd Foster", HelpURL=https://www.belfuse.com/resources/datasheets/circuitprotection/ds-cp-0zcg-series.pdf, Part Name=PTC,30V,500mA,1812, Vendor 1=Digikey
J1: library part Conn,USB-C,Elevated,SMD, "USB-C (USB TYPE-C) USB 2.0 Receptacle Connector 24 (16+8 Dummy) Position Surface Mount, Right Angle; Through Hole", Manufacturer 1=Molex, Manufacturer 1 Part Number=2171800001, Vendor 1 Part Number=900-2171800001CT-ND, CreatedBy="Judd Foster", HelpURL=https://www.molex.com/content/dam/molex/molex-dot-com/products/automated/en-us/salesdrawingpdf/217/217180/2171800001_sd.pdf?inline, Part Name=Conn,USB-C,Elevated,SMD, Vendor 1=DigiKey
J2: library part Conn,JST,2Pin,2.5mm,RA,Thru, "Connector Header Through Hole, Right Angle 2 position 0.098\" (2.50mm)", Manufacturer 1="JST Sales America Inc.", Vendor 1 Part Number=455-S2B-XH-A-ND, CreatedBy="Judd Foster", HelpURL=https://www.jst-mfg.com/product/pdf/eng/eXH.pdf, Manufacturer 1 Part Number=S2B-XH-A, Part Name=Conn,JST,2Pin,2.5mm,RA,Thru, Vendor 1=DigiKey
J3: library part "Term,Header,5x2 Pin,Shroud,1.27mm,SMD", "Connector Header Surface Mount 10 position 0.050\" (1.27mm)", Manufacturer 1="CNC Tech", Vendor 1 Part Number=1175-1735-ND, CreatedBy="Judd Foster", HelpURL=http://www.cnctech.us/pdfs/3221-XX-0300-00_.pdf, Manufacturer 1 Part Number=3221-10-0300-00, Part Name="Term,Header,5x2 Pin,Shroud,1.27mm,SMD", Vendor 1=Digikey
J4: library part Conn,RF,SMA,Fem,50R,Edge,SMD, "SMA Connector Jack, Female Socket Board Edge, End Launch Solder", Manufacturer 1="RF Solutions", Vendor 1 Part Number=CON-SMA-EDGE-S-ND, CreatedBy="Judd Foster", HelpURL=https://www.rfsolutions.co.uk/content/download-files/CON-SMA-EDGE-6-DATASHEET.pdf, Manufacturer 1 Part Number=CON-SMA-EDGE-S, Part Name=Conn,RF,SMA,Fem,50R,Edge,SMD, Vendor 1=DigiKey
L1 L2 L3: library part IND,10uH,680mA,Wirewound,1007, "10 ÂµH Unshielded Wirewound Inductor 680 mA 468mOhm Max 1007 (2518 Metric)", Manufacturer 1="Taiyo Yuden", Manufacturer 1 Part Number=LSQPA251818T100M, Vendor 1 Part Number=587-LSQPA251818T100MCT-ND, CreatedBy="Judd Foster", HelpURL=https://mm.digikey.com/Volume0/opasdata/d220001/medias/docus/6025/LSQPA251818T100M_SS.pdf, Part Name=IND,10uH,680mA,Wirewound,1007, Vendor 1=Digikey
L4 L5: library part Ferrite,470R@100MHz,0402, "470 Ohms @ 100 MHz 1 Power Line Ferrite Bead 0402 (1005 Metric) 1A 200mOhm", Manufacturer 1="Murata Electronics", Manufacturer 1 Part Number=BLM15PX471SN1D, Vendor 1 Part Number=490-10662-1-ND, CreatedBy="Judd Foster", HelpURL=https://www.murata.com/en-us/products/productdata/8796740059166/ENFA0018.pdf, Part Name=Ferrite,470R@100MHz,0402, Vendor 1=Digikey
Q1: library part "MOSFET,P Ch,20V,830mA", "P-Channel 20 V 830mA (Ta) 625mW (Ta) Surface Mount SC-89-3", Manufacturer 1=onsemi, Vendor 1 Part Number=FDY102PZCT-ND, CreatedBy="Judd Foster", HelpURL=https://rocelec.widen.net/view/pdf/hh954mlmw6/FAIR-S-A0000083184-1.pdf?t.download=true&u=5oefqw, Manufacturer 1 Part Number=FDY102PZ, Part Name="MOSFET,P Ch,20V,830mA", Vendor 1=Digikey
R1 R2 R6 R7 R18 R19: library part RES,5k11,1%,0.063W,0402, "5.11 kOhms ï¿½1% 0.063W, 1/16W Chip Resistor 0402 (1005 Metric) Automotive AEC-Q200, Moisture Resistant Thick Film", Manufacturer 1=Yageo, Manufacturer 1 Part Number=AC0402FR-075K11L, Vendor 1 Part Number=13-AC0402FR-075K11LCT-ND, CreatedBy="Judd Foster", HelpURL=https://www.yageo.com/upload/media/product/productsearch/datasheet/rchip/PYu-AC_51_RoHS_L_7.pdf, Part Name=RES,5k11,1%,0.063W,0402, Vendor 1=Digikey
R3 R12 R16 R21 R22 R23 R24 R25 R34 R35: library part RES,1k,0.1%,0.063W,0402, "1 kOhms Â±0.1% 0.063W, 1/16W Chip Resistor 0402 (1005 Metric) Thin Film", Manufacturer 1=YAGEO, Manufacturer 1 Part Number=RT0402BRE071KL, Vendor 1 Part Number=YAG2306CT-ND, CreatedBy="Judd Foster", HelpURL=https://www.yageo.com/upload/media/product/app/datasheet/rchip/pyu-rt_1-to-0.01_rohs_l.pdf, Part Name=RES,1k,0.1%,0.063W,0402, Vendor 1=DigiKey
R4 R26 R27: library part RES,10R,1%,0.063W,0402, "10 Ohms ï¿½1% 0.063W, 1/16W Chip Resistor 0402 (1005 Metric) Automotive AEC-Q200 Thick Film", Manufacturer 1="Panasonic Electronic Components", Manufacturer 1 Part Number=ERJ-2RKF10R0X, Vendor 1 Part Number=P10.0LCT-ND, CreatedBy="Judd Foster", HelpURL=https://industrial.panasonic.com/cdbs/www-data/pdf/RDA0000/AOA0000C304.pdf, Part Name=RES,10R,1%,0.063W,0402, Vendor 1=Digikey
R5 R11 R13 R14 R15 R17: library part RES,10k,0.1%,0.063W,0402, "10 kOhms ï¿½0.1% 0.1W, 1/10W Chip Resistor 0402 (1005 Metric) Automotive AEC-Q200 Thin Film", Manufacturer 1="Stackpole Electronics Inc", Manufacturer 1 Part Number=RNCF0402BTE10K0, Vendor 1 Part Number=RNCF0402BTE10K0CT-ND, CreatedBy="Judd Foster", HelpURL=https://www.seielect.com/catalog/sei-rncf.pdf, Part Name=RES,10k,0.1%,0.063W,0402, Vendor 1=Digikey
R8 R9 R10 R28: library part RES,Omit,0402, Manufacturer 1=N/A, CreatedBy="Judd Foster", HelpURL=N/A, Manufacturer 1 Part Number=N/A, Part Name=RES,Omit,0402, Vendor 1=N/A, Vendor 1 Part Number=N/A
R20: library part RES,330R,1%,0.063W,0402, "330 Ohms Â±1% 0.063W, 1/16W Chip Resistor 0402 (1005 Metric) Moisture Resistant Thick Film", Manufacturer 1=YAGEO, Manufacturer 1 Part Number=RC0402FR-07330RL, Vendor 1 Part Number=311-330LRCT-ND, CreatedBy="Judd Foster", HelpURL=https://www.yageo.com/upload/media/product/products/datasheet/rchip/PYu-RC_Group_51_RoHS_L_12.pdf, Part Name=RES,330R,1%,0.063W,0402, Vendor 1=DigiKey
R29 R30: library part RES,0R0,0.1W,0402, "0 Ohms Jumper 0.1W, 1/10W Chip Resistor 0402 (1005 Metric) Automotive AEC-Q200 Thick Film", Manufacturer 1="Panasonic Electronic Components", Manufacturer 1 Part Number=ERJ-2GE0R00X, Vendor 1 Part Number=P0.0JCT-ND, CreatedBy="Judd Foster", HelpURL=https://industrial.panasonic.com/cdbs/www-data/pdf/RDA0000/AOA0000C301.pdf, Part Name=RES,0R0,0.1W,0402, Vendor 1=Digikey
R31 R32: library part RES,499R,0.1%,0.52W,1206, "499 Ohms Â±0.1% 0.52W Chip Resistor 1206 (3216 Metric) Anti-Sulfur, Automotive AEC-Q200, Moisture Resistant Thin Film", Manufacturer 1="Vishay Dale", Manufacturer 1 Part Number=TNPW1206499RBEEA, Vendor 1 Part Number=541-3877-1-ND, CreatedBy="Judd Foster", HelpURL=https://www.vishay.com/docs/28758/tnpw_e3.pdf, Part Name=RES,499R,0.1%,0.52W,1206, Vendor 1=DigiKey
R33: library part RES,49R9,1%,0.063W,0402, "49.9 Ohms Â±1% 0.063W, 1/16W Chip Resistor 0402 (1005 Metric) Moisture Resistant Thick Film", Manufacturer 1=YAGEO, Manufacturer 1 Part Number=RC0402FR-0749R9L, Vendor 1 Part Number=311-49.9LRCT-ND, CreatedBy="Judd Foster", HelpURL=https://www.yageo.com/upload/media/product/products/datasheet/rchip/PYu-RC_Group_51_RoHS_L_12.pdf, Part Name=RES,49R9,1%,0.063W,0402, Vendor 1=DigiKey
SW1 SW2: library part Switch,Tactile,SPST-NO,SMD,H4.3, "Tactile Switch SPST-NO Top Actuated Surface Mount", Manufacturer 1=C&K, Vendor 1 Part Number=CKN9084CT-ND, CreatedBy="Judd Foster", HelpURL=https://www.ckswitches.com/media/1471/pts645.pdf, Manufacturer 1 Part Number="PTS645SK43SMTR92 LFS", Part Name=Switch,Tactile,SPST-NO,SMD,H4.3, Vendor 1=Digikey
SW3: library part Switch,Tactile,SPST-NO,SMD,H1.5, "Tactile Switch SPST-NO Top Actuated Surface Mount", Manufacturer 1=C&K, Vendor 1 Part Number=CKN9104CT-ND, CreatedBy="Judd Foster", HelpURL=https://www.ckswitches.com/media/1467/pts525.pdf, Manufacturer 1 Part Number="PTS525SM15SMTR2 LFS", Part Name=Switch,Tactile,SPST-NO,SMD,H1.5, Vendor 1=Digikey
T1: library part XFR,1-1.7,Lp=475uH,760390013, "Forward, Push-Pull Converters For For DC/DC Converters SMPS Transformer 3125Vrms Isolation 10kHz Surface Mount", Manufacturer 1="WÃ¼rth Elektronik", Part Name=XFR,1-1.7,Lp=475uH,760390013, Vendor 1 Part Number=732-4457-1-ND, CreatedBy="Judd Foster", HelpURL=https://www.we-online.com/components/products/datasheet/760390013.pdf, Manufacturer 1 Part Number=760390013, Vendor 1=DigiKey
U1: library part MCP73831T-2ACI_OT, "Charger IC Lithium Ion/Polymer SOT-23-5", Manufacturer 1="Microchip Technology", Vendor 1 Part Number=MCP73831T-2ACI/OTCT-ND, CreatedBy="Judd Foster", HelpURL=https://ww1.microchip.com/downloads/en/DeviceDoc/MCP73831-Family-Data-Sheet-DS20001984H.pdf, Manufacturer 1 Part Number=MCP73831T-2ACI/OT, Part Name=MCP73831T-2ACI_OT, Vendor 1=DigiKey
U2: "Boost Switching Regulator IC Positive Fixed 5V 1 Output 2.5A (Switch) SC-74A, SOT-753", Manufacturer 1="Texas Instruments", Vendor 1 Part Number=296-50503-1-ND, CreatedBy="Judd Foster", HelpURL=https://www.ti.com/lit/ds/symlink/tps61322.pdf?HQS=dis-dk-null-digikeymode-dsf-pf-null-wwe&ts=1737253084273, Manufacturer 1 Part Number=TPS613222ADBVR, Part Name=TPS613222ADBVR, Vendor 1=DigiKey
U3: "Push-Pull Switching Regulator IC Positive, Isolation Capable Adjustable 1 Output 1A 10-WFDFN Exposed Pad", Manufacturer 1="Analog Devices Inc.", Vendor 1 Part Number=505-LT3999EDD#PBF-ND, CreatedBy="Judd Foster", HelpURL=https://www.analog.com/media/en/technical-documentation/data-sheets/3999fa.pdf, Manufacturer 1 Part Number=LT3999EDD#PBF, Part Name=LT3999EDD#PBF, Vendor 1=DigiKey
U4: "Linear Voltage Regulator IC Positive and Negative Adjustable 2 Output 150mA 10-WSON (3x3)", Manufacturer 1="Texas Instruments", Vendor 1 Part Number=296-TPS7A3901DSCRCT-ND, CreatedBy="Judd Fosterr", HelpURL=https://www.ti.com/lit/ds/symlink/tps7a39.pdf?HQS=dis-dk-null-digikeymode-dsf-pf-null-wwe&ts=1737244835193&ref_url=https%253A%252F%252Fwww.ti.com%252Fgeneral%252Fdocs%252Fsuppproductinfo.tsp%253FdistId%253D10%2526gotoUrl%253Dhttps%253A%252F%252Fwww.ti.com, Manufacturer 1 Part Number=TPS7A3901DSCR, Part Name=TPS7A3901DSCR, Vendor 1=DigiKey
U5: "IC VREF SHUNT 36V 0.5% SOT23-3", Manufacturer 1="Texas Instruments", Vendor 1 Part Number=296-18872-1-ND, CreatedBy="Judd Foster", HelpURL=http://www.ti.com/lit/ds/symlink/tl431.pdf, Manufacturer 1 Part Number=TL431BIDBZR, Part Name=TL431BIDBZR, Vendor 1=Digikey
U6: library part PIC16F15323T-I_ST, "PIC PICÂ® XLPâ„¢ 16F Microcontroller IC 8-Bit 32MHz 3.5KB (2K x 14) FLASH 14-TSSOP", Manufacturer 1="Microchip Technology", Vendor 1 Part Number=PIC16F15323T-I/STCT-ND, CreatedBy="Judd Foster", HelpURL=https://ww1.microchip.com/downloads/en/DeviceDoc/PIC16_L_F15313_23_Data_Sheet_40001897C.pdf, Manufacturer 1 Part Number=PIC16F15323T-I/ST, Part Name=PIC16F15323T-I_ST, Vendor 1=DigiKey
U7: library part 24LC256T-I_MS, "EEPROM Memory IC 256Kbit I2C 400 kHz 900 ns 8-MSOP", Manufacturer 1="Microchip Technology", Vendor 1 Part Number=24LC256T-I/MSCT-ND, CreatedBy="Judd Foster", HelpURL=https://ww1.microchip.com/downloads/aemDocuments/documents/MPD/ProductDocuments/DataSheets/24AA256-24LC256-24FC256-256K-I2C-Serial-EEPROM-DS20001203.pdf, Manufacturer 1 Part Number=24LC256T-I/MS, Part Name=24LC256T-I_MS, Vendor 1=DigiKey
U8: library part LM7332MMX_NOPB, "General Purpose Amplifier 2 Circuit Rail-to-Rail 8-VSSOP", Manufacturer 1="Texas Instruments", Vendor 1 Part Number=296-LM7332MMX/NOPBCT-ND, CreatedBy="Judd Foster", HelpURL=https://www.ti.com/lit/ds/symlink/lm7332.pdf?HQS=dis-dk-null-digikeymode-dsf-pf-null-wwe&ts=1730932081789&ref_url=https%253A%252F%252Fwww.ti.com%252Fgeneral%252Fdocs%252Fsuppproductinfo.tsp%253FdistId%253D10%2526gotoUrl%253Dhttps%253A%252F%252Fwww.ti.com%, Manufacturer 1 Part Number=LM7332MMX/NOPB, Part Name=LM7332MMX_NOPB, Vendor 1=DigiKey
U9: "6us 12 I2C 2.7V~5.5V SOT-23-6 Digital To Analog Converters (DACs) ROHS", Manufacturer 1=Microchip, Vendor 1 Part Number=C144198, CreatedBy="Judd Foster", HelpURL=https://datasheet.lcsc.com/lcsc/1811151442_Microchip-Tech-MCP4725A0T-E-CH_C144198.pdf, Manufacturer 1 Part Number=MCP4725A0T-E/CH, Part Name=MCP4725A0T-E/CH, Vendor 1=LCSC
U10: "Differential Amplifier 1 Circuit 8-SOIC", Manufacturer 1="Analog Devices", Vendor 1 Part Number=505-AD8130ARZ-ND, CreatedBy="Judd Foster", HelpURL=https://www.analog.com/media/en/technical-documentation/data-sheets/AD8129_8130.pdf, Manufacturer 1 Part Number=AD8130ARZ, Part Name=AD8130ARZ, Vendor 1=DigiKey
U11: library part LMH6609MF_NOPB, "Voltage Feedback Amplifier 1 Circuit SOT-23-5", Manufacturer 1="Texas Instruments", Vendor 1 Part Number=LMH6609MF/NOPBCT-ND, CreatedBy="Judd Foster", HelpURL=https://www.ti.com/lit/ds/symlink/lmh6609.pdf, Manufacturer 1 Part Number=LMH6609MF/NOPB, Part Name=LMH6609MF_NOPB, Vendor 1=DigiKey

## Free pads (board coordinates)
  round 7 hole 3.3: ""(-30.5,-13) ""(-30.5,13) ""(30.5,-13) ""(30.5,13)

## Via types
v1: diameter 0.6, hole 0.3, L1 to L4, tented both sides, 211 vias

## Nets (pads, with @x,y where several pads share a name; then routed paths per layer and width w, separated by ;. In a path a pad name is that pad's centre, name@x,y a point inside that pad or via, vN(x,y) a via of type N, cw(c..) or ccw(c..) an arc to the next point about the centre after c; other vN are vias at no path point)
#PIC.MCLR: J3.8 R17.1 SW3.3 SW3.4 U6.4 | length 45.7
  L1 w0.2: v1(-16.2,-1.4) SW3.4@-16.2,5
  L4 w0.2: v1(-16.2,-1.4) -15.2,-2.4 -12.3,-2.4 -10.5,-4.2 -10.5,-6.193 -11.15,-6.843 -11.15,-7.9 -11.65,-8.4 -14.45,-8.4 ; v1(-14.73,-7.6) -14.73,-8.12 -14.45,-8.4 ; R17.1@-11.2,-11.25 -10.55,-11.25 -10.3,-11 U6.4@-7.45,-11 -5.35,-11 -5,-11.35 -5,-13.3 -5.4,-13.7 -14.586,-13.7 -15.2,-13.086 -15.2,-9.6 -14.73,-9.13 -14.73,-8.68 -14.45,-8.4
#PIC.ZERO: SW2.3 SW2.4 U6.11 | length 12
  L1 w0.2: SW2.3@-8.475,-13.25 -7.925,-13.8 -1.075,-13.8 SW2.4@-0.525,-13.25 -0.525,-12.125 -0.325,-11.925 v1(-0.325,-11)
  L4 w0.2: U6.11@-1.55,-11 v1(-0.325,-11)
+2V50REF: C16.2 C17.2 R12.1 R16.2 R23.1 U5.1 U5.2 | length 10.5
  L4 w0.2: C17.2@-13.4,-1 -12.4,-1 -12,-1.4 -12,-2 -10.3,-3.7 -6.5,-3.7 -5.9,-4.3 v1(-5.9,-5.55)
  other v1: -14.6,-0.45
+5V0: C2.2 C3.2 C6.2 C7.2 C8.2 C22.2 C23.2 J3.2 L4.1 R17.2 R18.2 R19.2 T1.2 U2.4 U3.3 U7.8 U9.3 | length 1
  L1 w0.2: U3.3@-6.9,0.725 -6.9,1.625 v1(-6.825,1.7)
  other v1: -12.3,-12.375 -11.2,-12.35 -18.54,-7.6 -7.725,-5.3 -7.725,-4.3 -4.2,-1.9 -4.2,-0.7 -4.2,0.5 13,1.6 13,2.6
+5V0AMP: C14.2 C15.2 C25.2 C26.2 C29.2 C34.2 C35.2 R11.2 R12.2 U4.10 U8.8 U10.3 U10.7 U11.5 | length 8.4
  L1 w0.2: U10.7@-24.635,2.725 -24.635,0.635 -23.365,-0.635 U10.3@-23.365,-2.725
  L1 w0.5: v1(18.95,5.9) 19.4,6.35 U11.5@21.2,6.35
  other v1: -20.7,-5.575 -14.6,-1.55 -24.6,4.425 19.95,5.7 20,6.725 4.95,7.925 5.95,7.925
+8V0AMP: C4.2 C5.2 C12.2 L2.2 U4.1 U4.2
  other v1: 5.13,-4.7 6.13,-4.7 6.2,4.3
+VBATT: C1.2 F1.2 Q1.2 R1.2 U1.3
  other v1: 6.45,-9.6 7.45,-9.6 17,-7.615 18,-7.615 19,-7.615
+VSW: L1.1 Q1.3
  other v1: 12,-3.785 13,-3.785
+VUSB: J1.A4/B9 J1.A9/B4 U1.4
  other v1: 6.45,-12.4 7.45,-12.4 28.564,-2.4 28.564,2.4
-5V0AMP: C18.1 C19.1 C27.1 C28.1 C31.1 C36.1 C37.1 R15.1 R31.1 R32.1 U4.6 U8.4 U10.2 U11.2 | length 1.4
  L1 w0.5: U11.2@23.8,7.3 24.425,7.3 v1(25,7.875)
  other v1: -24,-4 -13.4,-3.625 9.05,7.925 10.05,7.925 26.05,8.7 25.05,8.9
-8V0AMP: C9.1 C10.1 C20.1 L3.2 U4.5
  other v1: 7.425,3.4